# Altium PCB EXPLORER_V3.4.PcbDoc (part 1 of 4)
Units mm, origin at the board's own origin, x right, y up, seen from the top; angles counter-clockwise.
Board outline 160 x 121.01 mm, 2 copper layers (Top Layer, Bottom Layer); 254 components, 245 nets, 1181 pads, 772 vias.
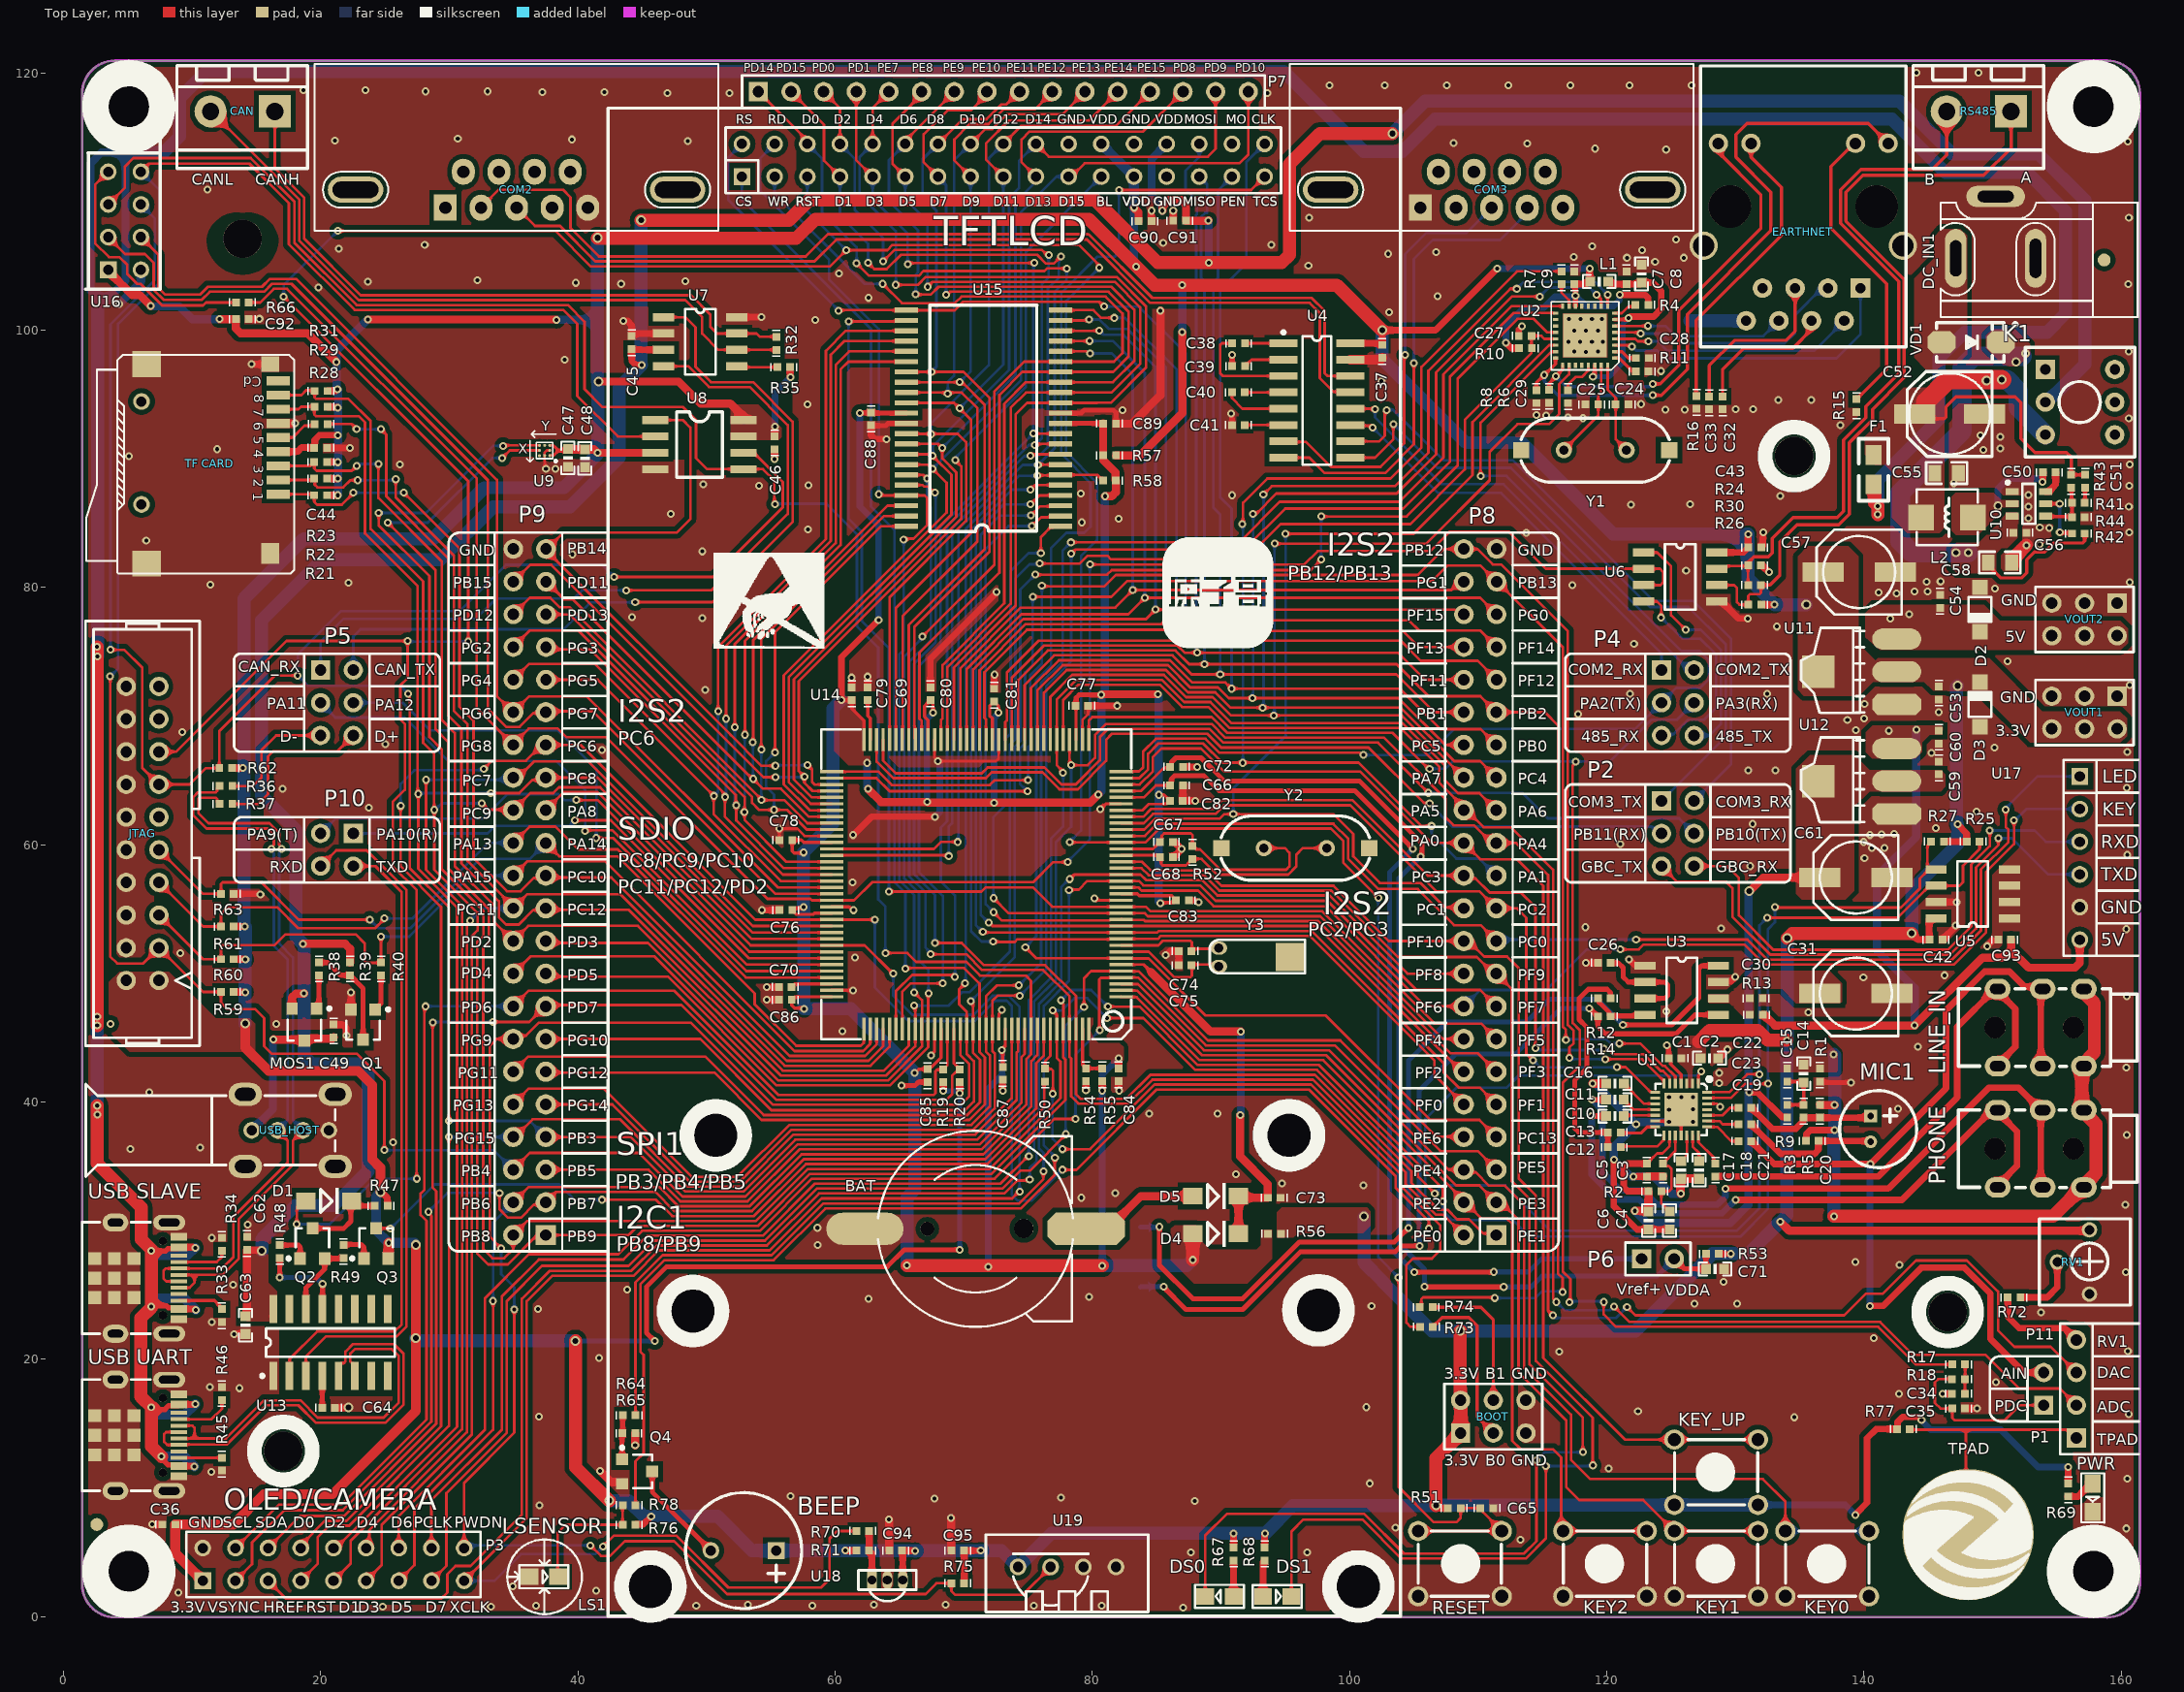
[diagram p0: Top Layer view]
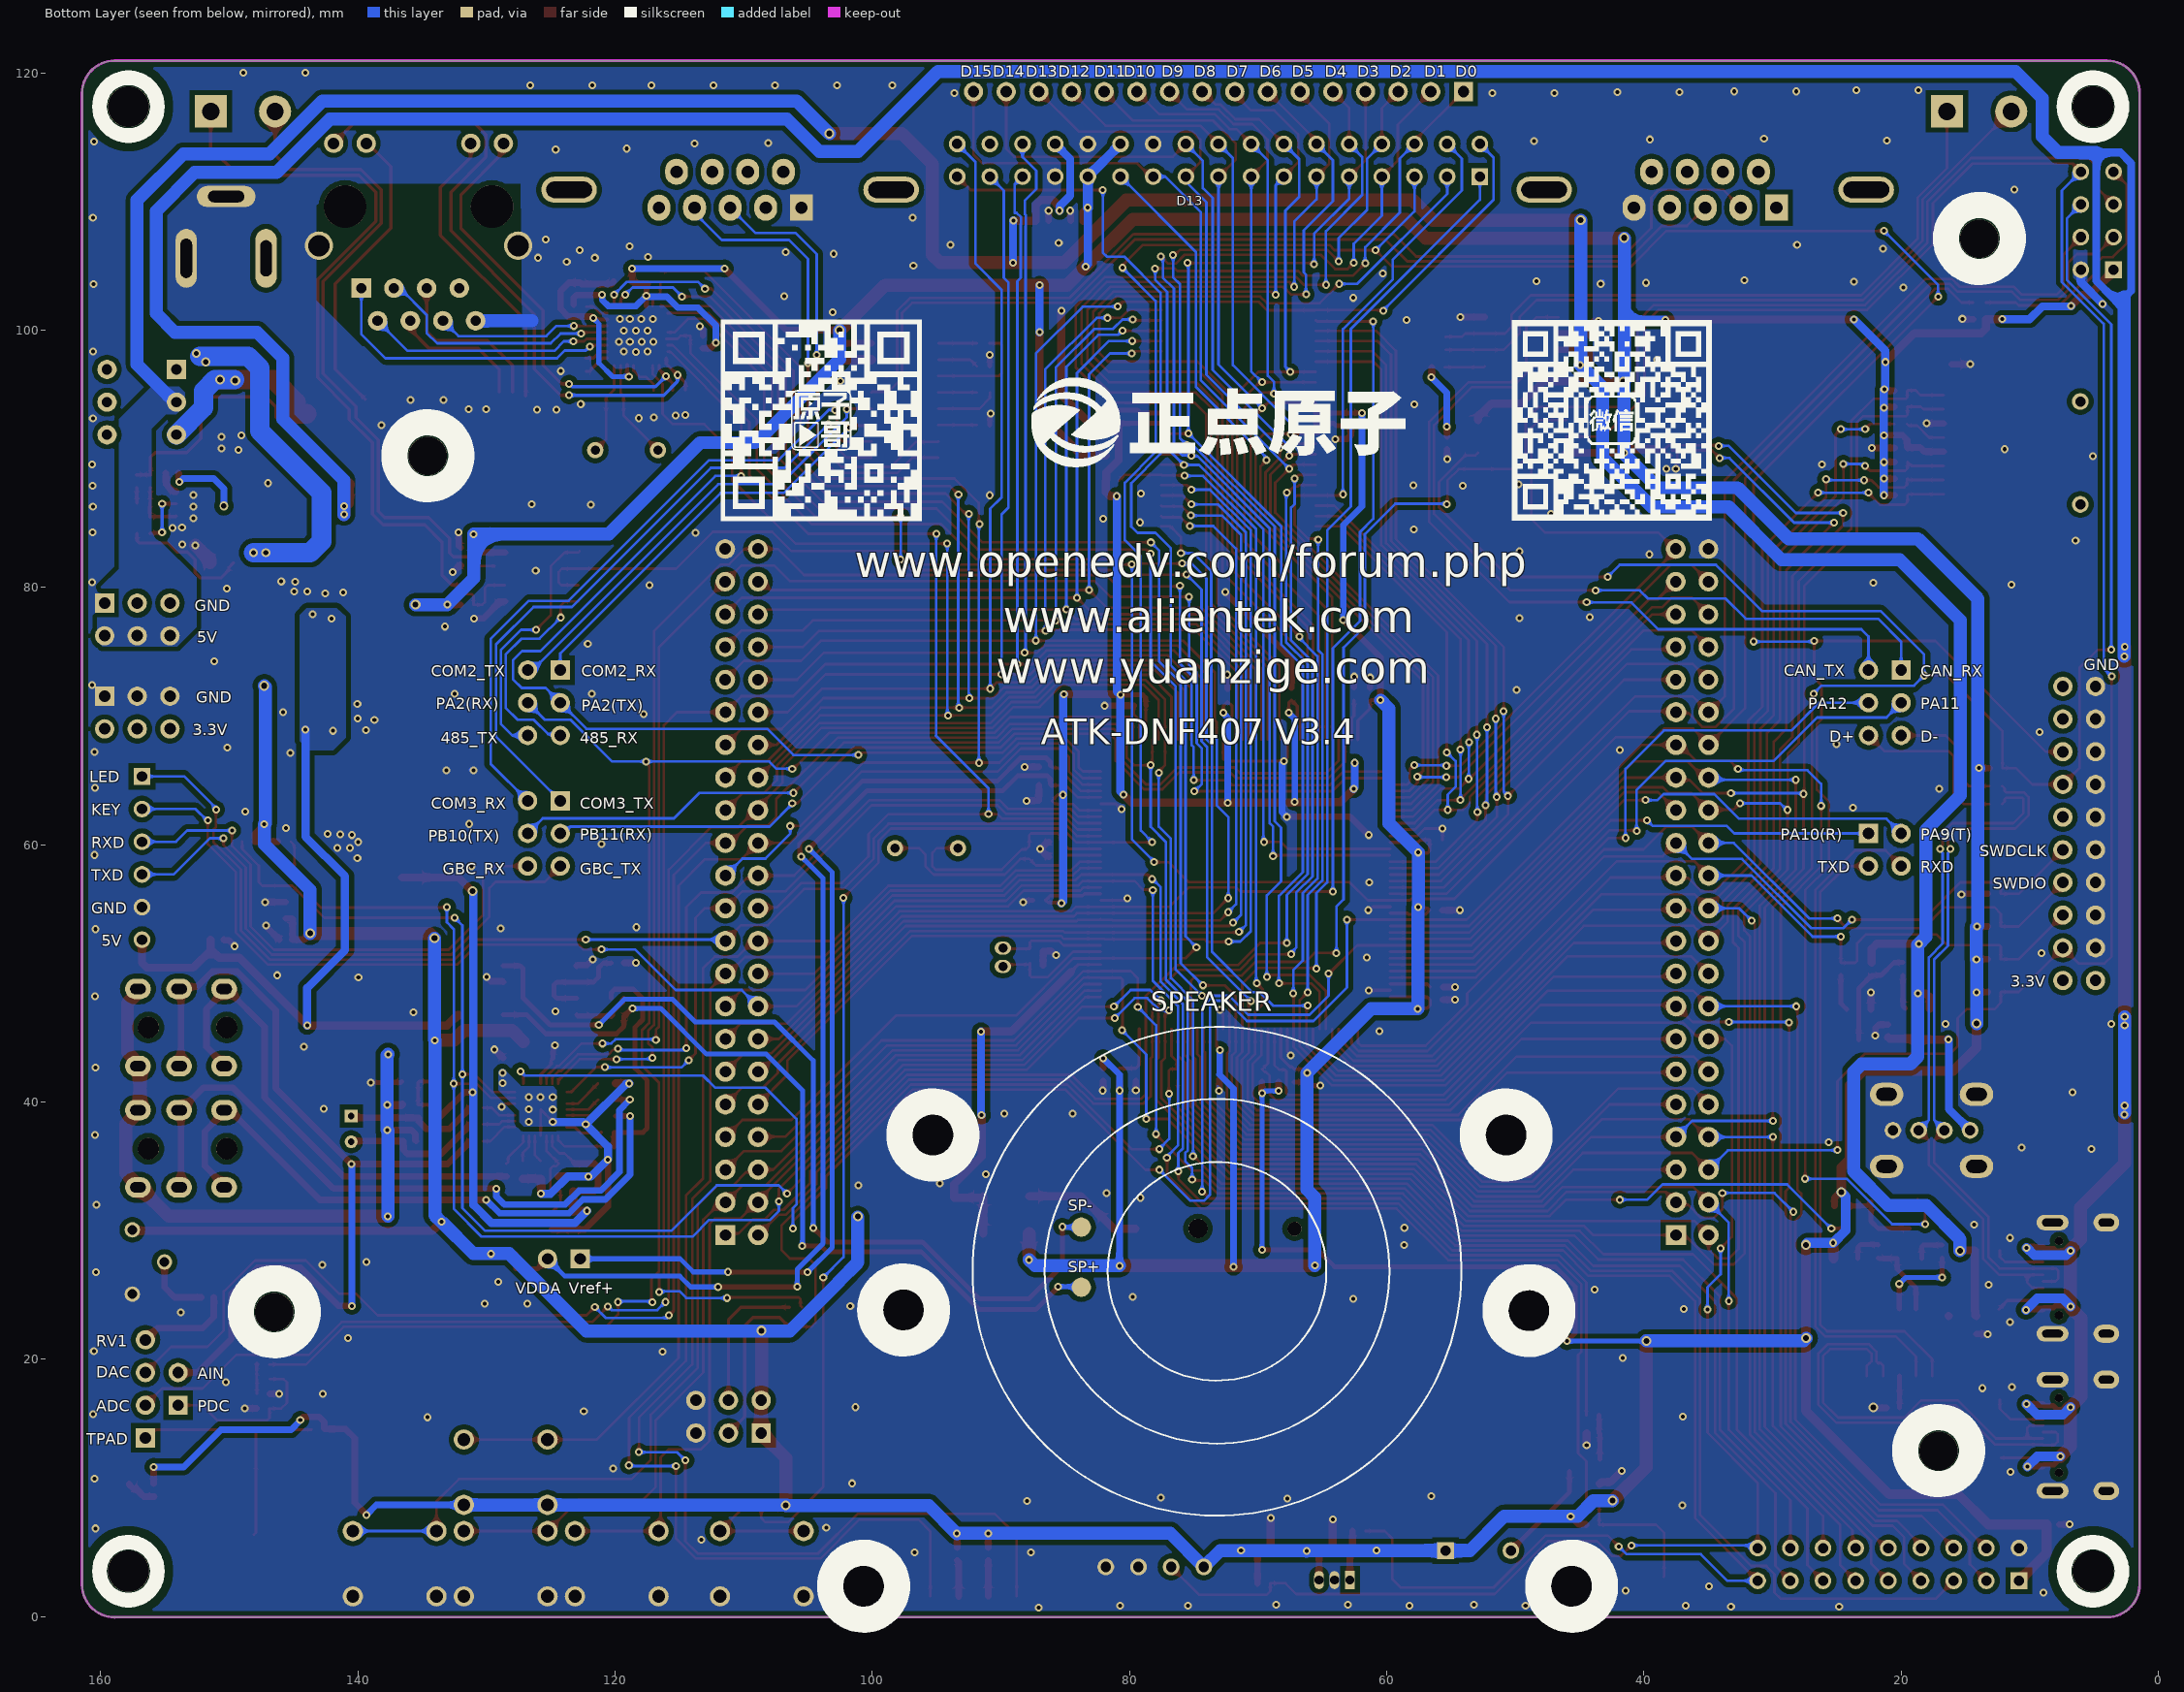
[diagram p1: Bottom Layer view, seen from below]

## Layer stack, top to bottom
Top Solder: solder mask 0.0102, Solder Resist, Dk 3.5
Top Layer: signal copper 0.0356
Dielectric1: dielectric 0.32, FR-4, Dk 4.8
Bottom Layer: signal copper 0.0356
Bottom Solder: solder mask 0.0102, Solder Resist, Dk 3.5

## Board outline
1.448,2.495 ccw(c3.988,2.495) 3.988,-0.045 158.908,-0.045 158.908,-0.051 ccw(c158.908,2.489) 161.448,2.489 161.448,118.415 ccw(c158.908,118.415) 158.908,120.955 3.988,120.955 ccw(c3.988,118.415) 1.448,118.415

## Design rules (kind name [scope] priority, off if disabled: settings)
Clearance [All] p1: gap=0.152 ignorepadtopadclearanceinfootprint=FALSE except(0: Arc-Hole Track-Hole SMDPad-Hole THPad-Hole Via-Hole Fill-Hole Poly-Hole Region-Hole Text-Hole; 0.381: Arc-Fill Arc-Poly Track-Fill Track-Poly SMDPad-Fill SMDPad-Poly THPad-Fill THPad-Poly Via-Fill Via-Poly Fill-Fill Fill-Poly Poly-Poly)
ComponentClearance [All] p1 off: gap=0.254 collisioncheckmode=3 verticalgap=0.254 showdistances=FALSE
DiffPairsRouting [InDifferentialPairClass('diff')] p1: maxlimit=0.203 minlimit=0.203 mostfreqgap=0.203 toplayer_minwidth=0.381 toplayer_maxwidth=0.381 toplayer_prefwidth=0.381 bottomlayer_minwidth=0.381 bottomlayer_maxwidth=0.381 bottomlayer_prefwidth=0.381 maxuncoupledlength=12.7
Height [All] p1 off: minheight=0 maxheight=25.4 prefheight=12.7
HoleSize [All] p1: absolutevalues=TRUE maxlimit=12.7 minlimit=0.025 maxpercent=80.000 minpercent=20.000
MinimumSolderMaskSliver [All] p1 off: minsoldermaskwidth=0.254
NetAntennae [All] p1 off: netantennaetolerance=0
PolygonConnect [All] p1: connectstyle=Direct reliefconductorwidth=0.254 reliefentries=4 polygonreliefangle="90 Angle" airgapwidth=0.254
RoutingVias [All] p1: holewidth=0.457 width=0.762 viastyle="Through Hole" minholewidth=0.254 minwidth=0.508 maxholewidth=0.457 maxwidth=0.762
SilkToSilkClearance [All] p1 off: silktosilkclearance=0.254
SilkToSolderMaskClearance SilkscreenOverComponentPads [IsPad] p1 off: minsilkscreentomaskgap=0.254 clearancetoexposedcopper=TRUE
SolderMaskExpansion [All] p1: expansion=0.102 istentingtop=FALSE
Width [All] p1: maxlimit=2.032 minlimit=0.152 preferedwidth=0.203
22 further rules are at their usual default settings.

## Classes and differential pairs
differential pair class diff: MDI_RX MDI_TX USB
component class DEVICE2: BEEP BOOT C92 C93 C94 C95 DS0 DS1 KEY0 KEY1 KEY2 KEY_UP LS1 P11 PWR Q4 R64 R65 R66 R67 R68 R69 R70 R71 R72 R73 R74 R75 R76 R77 R78 RV1 TPAD U16 U17 U18 U19
component class CORE_DEFG: C88 C89 C90 C91 JTAG P7 P8 P9 P10 R58 R59 R60 R61 R62 R63 TFT_LCD TFTLCD U15
component class CORE_ABC: "2.4'/2.8'/3.5'/4.3' LCD" 2.4'/2.8'LCD BAT C65 C66 C67 C68 C69 C70 C71 C72 C73 C74 C75 C76 C77 C78 C79 C80 C81 C82 C83 C84 C85 C86 C87 D4 D5 P6 R51 R52 R53 R54 R55 R56 R57 RESET U14 Y2 Y3
component class POWER&USB_USART: C50 C51 C52 C53 C54 C55 C56 C57 C58 C59 C60 C61 C62 C63 C64 D1 D2 D3 D6 D7 D8 DC_IN1 F1 K1 L2 Q2 Q3 R41 R42 R43 R44 R45 R46 R47 R48 R49 R50 U10 U11 U12 U13 "USB UART" VD1 VOUT1 VOUT2
component class DEVICE1: C36 C37 C38 C39 C40 C41 C42 C43 C44 C45 C46 C47 C48 C49 CAN COM2 COM3 MOS1 P2 P3 P4 P5 Q1 R19 R20 R21 R22 R23 R24 R25 R26 R27 R28 R29 R30 R31 R32 R33 R34 R35 R36 R37 R38 R39 R40 RS485 "TF CARD" U4 U5 U6 U7 U8 U9 USB1 "USB SLAVE" USB_HOST
component class AUDIO&ETHNET: C1 C2 C3 C4 C5 C6 C7 C8 C9 C10 C11 C12 C13 C14 C15 C16 C17 C18 C19 C20 C21 C22 C23 C24 C25 C26 C27 C28 C29 C30 C31 C32 C33 C34 C35 EARTHNET J1 L1 LINE_IN MIC1 P1 PHONE R1 R2 R3 R4 R5 R6 R7 R8 R9 R10 R11 R12 R13 R14 R15 R16 R17 R18 SP+ SP- U1 U2 U3 Y1

## Components (designator, comment, footprint, x,y, rotation, side; value= is the part's Value field where it differs from the comment)
BAT "BATT" BATM 70.917,30.15 r90 top locked
BEEP "BEEP" BELL-5 55.423,5.131 r180 top
BOOT "Header 3X2" HDR2X3 108.636,14.275 r0 top locked
C1 "104" 0402 124.816,43.409 r0 top
C2 "10uF" 0603P 127.991,43.409 r180 top
C3 "104" 0402 124.384,34.214 r90 top
C4 "10uF" 0603P 124.892,30.785 r90 top
C5 "104" 0402 123.114,34.214 r90 top
C6 "10uF" 0603P 123.241,30.785 r90 top
C7 "104" 0402 121.539,104.581 r270 top
C8 "10uF" 0603P 122.707,104.382 r90 top
C9 "104" 0402 117.475,104.581 r270 top
C10 "10uF" 0603P 120.637,38.911 r180 top
C11 "10uF" 0603P 120.637,40.181 r180 top
C12 "1uF" 0402 121.082,36.5 r180 top
C13 "1uF" 0402 121.082,37.643 r180 top
C14 "10uF" 0603P 135.306,42.215 r90 top
C15 "104" 0402 134.036,42.596 r270 top
C16 "10uF" 0603P 120.637,41.451 r0 top
C17 "10uF" 0603P 125.781,34.722 r90 top
C18 "10uF" 0603P 127.178,34.722 r90 top
C19 "1uF" 0402 131.242,36.957 r180 top
C20 "103" 0402 136.576,38.786 r90 top
C21 "1uF" 0402 128.448,34.214 r90 top
C22 "104" 0402 131.242,39.548 r180 top
C23 "104" 0402 131.242,38.278 r180 top
C24 "22" 0402 121.691,94.234 r180 top
C25 "22" 0402 118.339,94.234 r0 top
C26 "1uF" 0402 119.304,50.825 r0 top
C27 "104" 0402 113.157,99.568 r0 top
C28 "104" 0402 123.266,97.841 r180 top
C29 "104" 0402 116.992,94.336 r90 top
C30 "104" 0402 131.115,48.057 r0 top
C31 "220uF" CC6.56.5 139.37,48.438 r0 top locked
C32 "104" 0402 129.007,93.853 r90 top
C33 "104" 0402 127.965,93.853 r90 top
C34 "102" 0402 146.847,17.323 r0 top
C35 "101" 0402 147.863,16.18 r180 top
C36 "104" 0402 8.687,7.163 r180 top
C37 "104" 0402 102.54,98.857 r270 top
C38 "1uF" 0402 91.872,98.984 r180 top
C39 "1uF" 0402 91.872,97.206 r180 top
C40 "1uF" 0402 90.856,95.174 r0 top
C41 "1uF" 0402 90.856,92.634 r0 top
C42 "104" 0402 146.101,52.629 r180 top
C43 "104" 0402 132.004,83.109 r180 top
C44 "104" 0402 20.498,90.856 r180 top
C45 "104" 0402 44.183,98.539 r90 top
C46 "104" 0402 55.296,91.745 r270 top
C47 "104" 0603P 39.218,90.068 r90 top
C48 "104" 0603P 40.538,90.043 r90 top
C49 "104" 0402 21.006,46.025 r270 top
C50 "104" 0402 154.903,88.96 r180 top
C51 "NC" 0402 157.208,87.76 r90 top
C52 "470uF" "CM D(6.3*5.4)" 146.66,93.497 r180 top
C53 "104" 0402 145.821,71.298 r90 top
C54 "104" 0402 145.923,79.426 r270 top
C55 "22uF" "C 0805" 146.429,88.898 r0 top
C56 "104" 0402 152.624,84.26 r180 top
C57 "220uF" CC6.56.5 139.624,81.204 r0 top locked
C58 "22uF/25V" "C 0805" 150.571,81.939 r180 top
C59 "104" 0402 145.821,66.472 r270 top
C60 "104" 0402 145.821,67.869 r90 top
C61 "220uF" CC6.56.5 139.37,57.455 r0 top locked
C62 "104" 0402 14.275,29.515 r270 top
C63 "10uF" 0603P 14.148,22.657 r90 top
C64 "104" 0402 20.117,16.231 r0 top
C65 "104" 0402 111.176,8.433 r180 top
C66 "225" 0402 87.046,64.618 r180 top
C67 "22" 0402 86.258,60.223 r180 top
C68 "22" 0402 86.258,59.055 r180 top
C69 "225" 0402 62.535,71.247 r90 top
C70 "225" 0402 56.617,48.946 r180 top
C71 "10uF" 0603P 128.422,27.026 r180 top
C72 "104" 0402 87.046,66.065 r180 top
C73 "104" 0402 93.65,32.563 r0 top
C74 "10" 0402 86.716,51.74 r0 top
C75 "10" 0402 86.716,50.622 r0 top
C76 "104" 0402 55.661,54.915 r0 top
C77 "104" 0402 79.68,70.815 r180 top
C78 "104" 0402 55.661,60.376 r0 top
C79 "104" 0402 61.29,72.238 r270 top
C80 "104" 0402 67.412,72.238 r270 top
C81 "104" 0402 72.365,72.136 r270 top
C82 "104" 0402 87.03,63.424 r180 top
C83 "104" 0402 87.503,55.677 r180 top
C84 "104" 0402 82.042,41.621 r90 top
C85 "104" 0402 67.183,41.554 r90 top
C86 "104" 0402 55.626,47.955 r0 top
C87 "104" 0402 73.025,41.732 r90 top
C88 "10uF" 0402 62.789,92.608 r90 top
C89 "10uF" 0402 81.839,92.735 r180 top
C90 "104" 0402 83.591,108.483 r0 top
C91 "104" 0402 86.284,108.509 r0 top
C92 "104" 0402 14.402,100.863 r180 top
C93 "104" 0402 151.435,52.629 r180 top
C94 "104" 0402 65.202,5.131 r180 top
C95 "104" 0402 70.028,5.131 r180 top
CAN "CAN" HEAD2L-0.8 16.434,117.018 r180 top locked
COM2 "USART_F(母头)" DB9 35.23,109.525 r0 top locked
COM3 "USART_M(公头)" DB9 111.049,109.525 r0 top locked
D1 "1N4148" DIODE_SOP 18.847,32.309 r0 top
D2 "SMFJ5.0CA" SOD-123 149.022,78.283 r90 top
D3 "SMFJ3.3CA" SOD-123 149.022,70.917 r270 top
D4 "1N4148" DIODE_SOP 87.808,29.769 r0 top
D5 "1N4148" DIODE_SOP 87.808,32.69 r0 top
DC_IN1 "DC_IN" DC10B 157.785,109.906 r180 top locked
DS0 "LED1" SMDLED 90.983,1.575 r180 top
DS1 "LED1" SMDLED 93.269,1.575 r0 top
EARTHNET "RJ45" HR911105A 135.28,109.626 r0 top
F1 "1000mA" 0805 140.741,88.011 r90 top
JTAG "JTAG" JTAG_20 6.147,60.884 r90 top locked
K1 "BUTTON" BTN8.5*8.5 154.102,96.952 r0 top locked
KEY0 "KEY_M" KEY_M 140.386,1.575 r180 top locked
KEY1 "KEY_M" KEY_M 131.75,1.575 r180 top locked
KEY2 "KEY_M" KEY_M 123.114,1.575 r180 top locked
KEY_UP "KEY_M" KEY_M 131.75,8.687 r180 top locked
L1 "220R,2.0A,0.05DCR" 0603P 119.405,103.784 r0 top
L2 "4.7uH" L-SMD-0420 146.454,85.455 r180 top
LINE_IN "LINE_IN" PHONE_ST 153.746,45.796 r0 top
LS1 "LSENS" SMDLED 36.246,3.099 r0 top locked
MIC1 "MIC" MIC-6022 140.513,38.913 r270 top locked
MOS1 "SI2301" SO-G3/C2.5 18.72,46.025 r180 top
P1 "Header 2" HDR1X2 153.975,16.434 r90 top locked
P2 "RS232/BTCOM&GPS" HDR2X3 124.257,63.424 r270 top
P3 "OV2640" HDR2X9 10.829,2.788 r0 top locked
P4 "RS232/RS485" HDR2X3 124.257,73.584 r270 top locked
P5 "USB/CAN" HDR2X3 19.99,73.584 r270 top locked
P6 "VREF_SEL" HDR1X2 122.707,27.813 r0 top
P7 "HEAD1*16" HDR1X16 54.026,118.542 r0 top locked
P8 "HEAD2*22" HEAD2*22 111.43,29.653 r90 top locked
P9 "HEAD2*22" HEAD2*22 37.516,29.653 r90 top locked
P10 "USART1" HDR2X2 22.53,60.884 r180 top
P11 "Header 4" HDR1X4 156.515,13.894 r90 top locked
PHONE "PHONE" PHONE_ST 153.746,36.373 r0 top
PWR "SYS" SMDLED 157.785,10.338 r270 top
Q1 "S8050" SOT-23R 23.292,46.152 r180 top
Q2 "S8050" SOT-23R 19.355,28.88 r0 top
Q3 "S8550" SOT-23R 24.308,28.88 r0 top
Q4 "S8050" SOT-23R 44.475,11.278 r270 top
R1 "0R" 0402 136.576,42.596 r270 top
R2 "10R" 0402 123.241,33.071 r0 top
R3 "2K" 0402 134.036,38.786 r90 top
R4 "4.7K" 0402 122.225,101.981 r0 top
R5 "2K" 0402 135.306,38.786 r90 top
R6 "4.7K" 0402 115.519,94.361 r90 top
R7 "22R" 0402 116.484,103.581 r90 top
R8 "4.7K" 0402 114.529,94.336 r90 top
R9 "680R" 0402 136.474,36.982 r180 top
R10 "4.7K" 0402 114.173,98.603 r180 top
R11 "2.49K" 0402 122.25,96.799 r0 top
R12 "5.6K" 0402 119.304,48.057 r0 top
R13 "10R" 0402 132.131,46.787 r180 top
R14 "20K" 0402 119.304,46.66 r0 top
R15 "510R" 0402 139.421,94.64 r270 top
R16 "510R" 0402 126.975,94.894 r270 top
R17 "4.7K" 0402 147.863,19.609 r180 top
R18 "47K" 0402 146.847,18.466 r0 top
R19 "4.7K" 0402 68.402,42.545 r270 top
R20 "4.7K" 0402 69.698,42.545 r270 top
R21 "47K" 0402 20.498,87.173 r180 top
R22 "47K" 0402 20.498,88.464 r180 top
R23 "47K" 0402 20.498,89.755 r180 top
R24 "360R" 0402 130.988,81.712 r0 top
R25 "4.7K" 0402 148.996,60.249 r180 top
R26 "360R" 0402 132.004,78.664 r180 top
R27 "4.7K" 0402 145.212,60.249 r0 top
R28 "100R" 0402 19.533,92.71 r0 top
R29 "47K" 0402 20.523,94.056 r180 top
R30 "120R" 0402 130.988,80.188 r0 top
R31 "47K" 0402 20.523,95.275 r180 top
R32 "120R" 0402 55.423,98.476 r90 top
R33 "4.7K" 0402 12.319,23.901 r270 top
R34 "4.7K" 0402 12.319,28.448 r90 top
R35 "510R" 0402 55.499,97.13 r0 top
R36 "10R" 0402 13.132,64.567 r180 top
R37 "10R" 0402 13.132,63.17 r180 top
R38 "10K" 0402 19.863,50.851 r270 top
R39 "100K" 0402 22.276,50.851 r270 top
R40 "4.7K" 0402 24.689,49.851 r90 top
R41 "0R" 0402 156.171,86.583 r0 top
R42 "100K" 0402 156.171,84.196 r0 top
R43 "52.3K 1%" 0402 156.113,87.76 r90 top
R44 "10K 1%" 0402 156.171,85.471 r0 top
R45 "4.7K" 0402 12.319,12.347 r270 top
R46 "4.7K" 0402 12.319,16.84 r90 top
R47 "10K" 0402 25.197,31.928 r180 top
R48 "1K" 0402 16.815,28.88 r270 top
R49 "1K" 0402 21.768,28.88 r270 top
R50 "1K" 0402 76.327,42.596 r270 top
R51 "10K" 0402 108.636,8.433 r180 top
R52 "1M" 0402 87.782,58.903 r90 top
R53 "10R" 0402 127.711,28.194 r0 top
R54 "0R" 0402 79.502,42.621 r270 top
R55 "0R" 0402 80.772,42.621 r270 top
R56 "0R" 0402 94.666,29.769 r180 top
R57 "0R" 0402 81.839,90.272 r180 top
R58 "10K" 0402 80.823,88.316 r0 top
R59 "10K" 0402 12.243,48.565 r0 top
R60 "10K" 0402 12.243,51.105 r0 top
R61 "10K" 0402 12.243,53.645 r0 top
R62 "10K" 0402 12.116,65.964 r0 top
R63 "10K" 0402 12.243,56.185 r0 top
R64 "1K" 0402 44.475,15.646 r180 top
R65 "10K" 0402 43.459,14.249 r0 top
R66 "1K" 0402 14.402,102.159 r180 top
R67 "510R" 0402 90.983,4.369 r90 top
R68 "510R" 0402 93.396,4.369 r90 top
R69 "510R" 0402 155.88,9.347 r90 top
R70 "1K" 0402 61.646,6.655 r0 top
R71 "4.7K" 0402 61.646,5.131 r0 top
R72 "1K" 0402 151.165,24.816 r0 top
R73 "10K" 0402 106.477,22.53 r180 top
R74 "10K" 0402 105.461,24.054 r0 top
R75 "4.7K" 0402 69.037,2.591 r0 top
R76 "47K" 0402 43.485,7.137 r0 top
R77 "1M" 0402 143.561,14.58 r180 top
R78 "1K" 0402 44.475,8.661 r180 top
RESET "KEY_M" KEY_M 105.334,6.655 r0 top locked
RS485 "RS485" HEAD2L-0.8 151.435,117.018 r180 top locked
RV1 "50K" RV 157.531,25.07 r0 top locked
SP+ "SPK+" TP-1.5 83.744,25.603 r90 top
SP- "SPK-" TP-1.5 83.744,30.277 r90 top
"TF CARD" "SD-MICRO-TF" SD-MICRO-TF 16.688,87.258 r270 top locked
TFTLCD "TFT_LCD" db2*17-4.3 52.756,111.938 r0 top locked
TPAD "ALIENTEK" ATK_TPAD 147.955,11.582 r0 top
U1 "ES8388" qfn28 125.781,39.421 r270 top locked
U2 "YT8512C" YT8512C 120.066,97.282 r180 top
U3 "MD8002A" SOP-8 122.987,50.597 r0 top locked
U4 "TPT3232" SOP16M 97.46,94.539 r270 top locked
U5 "24C02" SOP-8 151.308,54.28 r180 top locked
U6 "TPT8485" SOP-8 122.86,82.728 r0 top locked
U7 "SIT1050T" SOP-8 46.66,101.016 r0 top
U8 "25Q128" SOIC-8 46.025,93.015 r0 top locked
U9 "ST480MC" ST480MC 37.414,90.653 r0 top
U10 "SCT2230CTVB" SOT23-6N 152.83,86.511 r180 top
U11 "AMS1117-3.3" AMS1117 142.545,70.917 r90 top locked
U12 "AMS1117-3.3" AMS1117 142.545,62.408 r90 top
U13 "CH340C" SOP16M 20.752,21.311 r0 top locked
U14 "STM32F407ZGT6" LQFP144 82.22,48.184 r180 top locked
U15 "XM8A51216V33A" TSOP44 77.521,84.76 r180 top locked
U16 "WIRELESS" NRF24L01 6.02,104.699 r0 top locked
U17 "ATK MODULE" HEAD6 156.769,65.329 r270 top locked
U18 "LF0038GKLL-1" IR-LF0038GKLL-1 62.789,2.845 r0 top
U19 "DHT11&DS18B20" DHT11 74.219,3.861 r0 top
"USB SLAVE" "USB-B(Mini)" "USB Type-C" 6.502,26.314 r270 top
"USB UART" "USB" "USB Type-C" 6.502,14.097 r270 top
USB_HOST "USB-A-90" USB-A-90 21.133,35.103 r0 top locked
VD1 "SS34" SMA 148.332,99.06 r0 top
VOUT1 "VCC3.3" HDR2X3 159.69,71.552 r180 top locked
VOUT2 "VCC5" HDR2X3 159.69,78.791 r180 top locked
Y1 "25MHz" XTAL_US 121.539,90.678 r180 top
Y2 "8MHz" XTAL_US 98.222,59.741 r180 top locked
Y3 "32.768K" XTAL32 89.84,51.968 r0 top locked

## Footprints (in the part's own frame and the unit in brackets; to place one, negate y for a bottom-side part, rotate by r counter-clockwise, add the part's x,y. Pads: shape width x height; smd on the part's side, far side on the other; paste and mask are expansions set on the pad)
0402 [mm]
  rect 0.6x0.6 smd: 1(0,0) 2(1,0)
  silkscreen extent -0.5,-0.3 1.5,0.3
0603P [mil]
  rect 30x30 smd: 1(-27,0) 2(27.5,-0.06)
  silkscreen extent -50,-20 50,20
0805 [mil]
  rect 60x50 smd: 1(0,-0.06) 2(90,-0.06)
  silkscreen extent -50,-45 140,45
AMS1117 [mil]
  oct 65x150 smd: 1(0.03,-0.06)
  oval 65x150 smd: 2(100.03,-0.06) 3(200.03,-0.06)
  rect 100x100 smd: 4(100.03,239.94)
  silkscreen extent -26,100 234,293
ATK_TPAD [mil]
  round 402 smd paste-450 mask+4: 1(5,-205)
  silkscreen extent -190,-402 202,-9
BATM [mm]
  round 1.1 hole 1.1 unplated: 0(0,3.748)
  round 1.5 hole 1.5 unplated: 0(0.025,-3.752)
  oct 2.5x6 smd: 1(0,-8.602)
  oval 2.5x6 smd: 2(0,8.598)
  silkscreen extent -7.62,-7.58 7.62,7.57
BELL-5 [mm] "PIN:5MM,SIZE:10MM"
  rect 1.3x1.3 hole 0.8: 1(0,0)
  round 1.3 hole 0.8: 2(5.08,0)
  silkscreen extent -1.97,-4.51 7.05,4.51
BTN8.5*8.5 [mm]
  rect 1.5x1.5 hole 0.8: 1(0,0)
  round 1.5 hole 0.8: 2(0,-2.54) 3(0,-5.08) 4(5.4,-5.08) 5(5.4,-2.54) 6(5.4,0)
  silkscreen extent -1.55,-6.79 6.95,1.71
"C 0805" [mm] "无极性贴片电容(0805)"
  rect 1x1.27 smd: 1(-0.914,0) 2(0.914,0)
  silkscreen extent -1.6,-0.84 1.6,0.84, body extent -1,-0.61 1,0.61, height 0.51
CC6.56.5 [mm]
  rect 3.2x1.5 smd: 1(-2.794,0) 2(2.8,0)
  silkscreen extent -3.3,-3.3 3.3,3.3
"CM D(6.3*5.4)" [mm] "贴片电解电容，直径6.3mm，高5.4mm"
  rect 3.2x1.5 smd: 1(2.7,0) 2(-2.7,0)
  silkscreen extent -3.3,-3.3 3.3,3.3, body extent -3.5,-3.3 3.5,3.3, height 5.4
db2*17-4.3 [mm] "DB_LCD-4.3'"
  rect 1.3x1.3 hole 0.8: 1(-0.002,0.006)
  round 1.3 hole 0.8: 2(-0.002,2.546) 3(2.538,0.006) 4(2.538,2.546) 5(5.08,0) 6(5.078,2.546) 7(7.62,0) 8(7.62,2.54) 9(10.158,0.006) 10(10.158,2.546) 11(12.698,0.006) 12(12.698,2.546) 13(15.238,0.006) 14(15.238,2.546) 15(17.778,0.006) 16(17.778,2.546) 17(20.318,0.006) 18(20.318,2.546) 19(22.858,0.006) 20(22.858,2.546) 21(25.398,0.006) 22(25.398,2.546) 23(27.938,0.006) 24(27.938,2.546) 25(30.478,0.006) 26(30.478,2.546) 27(33.018,0.006) 28(33.018,2.546) 29(35.558,0.006) 30(35.558,2.546) 31(38.098,0.006) 32(38.098,2.546) 33(40.638,0.006) 34(40.638,2.546)
  round 3.4 hole 3.4: ""(-7.125,-109.596) ""(-3.81,-88.18) ""(-2.037,-74.525) ""(42.54,-74.525) ""(44.82,-88.12) ""(47.925,-109.596)
  silkscreen extent -10.4,-111.89 51.19,5.33
DB9 [mil]
  oval 170x80 hole 50 slot 140 at 0 deg: 0(-493,55) 0(493,55)
  rect 70x80 hole 38: 1(-218,0)
  oval 70x80 hole 38: 2(-109,0) 3(0,0) 4(109,0) 5(218,0) 6(-163,110) 7(-54,110) 8(55,110) 9(164,110)
  silkscreen extent -618,-70 618,440
DC10B [mil]
  oval 65x180 hole 35 slot 110 at 90 deg: 1(419.09,170)
  oval 65x180 hole 35 slot 120 at 90 deg: 2(175,170)
  oval 180x65 hole 35 slot 110 at 0 deg: 3(297.05,-19.35)
  silkscreen extent -138,0 465,350
DHT11 [mm] "2.54mm"
  round 1.3 hole 0.8: 1(0,0) 2(2.54,0) 3(5.08,0) 4(7.62,0)
  silkscreen extent -2.5,-3.5 10.12,2.5
DIODE_SOP [mm]
  rect 1.5x1.3 smd: 1(0,0) 2(3.556,0)
  silkscreen extent 1.14,-1.02 2.56,1.02
HDR1X2 [mm] "Connector; Header; 2 Position"
  rect 1.5x1.5 hole 0.9: 1(0,0)
  round 1.5 hole 0.9: 2(2.54,0)
  silkscreen extent -1.27,-1.27 3.81,1.27
HDR1X4 [mm] "Connector; Header; 4 Position"
  rect 1.5x1.5 hole 0.9: 1(0,0)
  round 1.5 hole 0.9: 2(2.54,0) 3(5.08,0) 4(7.62,0)
  silkscreen extent -1.27,-1.27 8.89,1.27
HDR1X16 [mm] "Connector; Header; 16 Position"
  rect 1.5x1.5 hole 0.9: 1(0,0)
  round 1.5 hole 0.9: 2(2.54,0) 3(5.08,0) 4(7.62,0) 5(10.16,0) 6(12.7,0) 7(15.24,0) 8(17.78,0) 9(20.32,0) 10(22.86,0) 11(25.4,0) 12(27.94,0) 13(30.48,0) 14(33.02,0) 15(35.56,0) 16(38.1,0)
  silkscreen extent -1.27,-1.27 39.37,1.27
HDR2X2 [mm] "Connector; Header; 2x2 Position"
  rect 1.5x1.5 hole 0.9: 1(0,0)
  round 1.5 hole 0.9: 2(0,2.54) 3(2.54,0) 4(2.54,2.54)
  silkscreen extent -1.27,-1.27 3.81,3.81
HDR2X3 [mm] "Connector; Header; 3x2 Position"
  rect 1.5x1.5 hole 0.9: 1(0,0)
  round 1.5 hole 0.9: 2(0,2.54) 3(2.54,0) 4(2.54,2.54) 5(5.08,0) 6(5.08,2.54)
  silkscreen extent -1.27,-1.27 6.35,3.81
HDR2X9 [mm] "Connector; Header; 9x2 Position"
  rect 1.3x1.3 hole 0.8: 1(0,0)
  round 1.3 hole 0.8: 2(0,2.54) 3(2.54,0) 4(2.54,2.54) 5(5.08,0) 6(5.08,2.54) 7(7.62,0) 8(7.62,2.54) 9(10.16,0) 10(10.16,2.54) 11(12.7,0) 12(12.7,2.54) 13(15.24,0) 14(15.24,2.54) 15(17.78,0) 16(17.78,2.54) 17(20.32,0) 18(20.32,2.54)
  silkscreen extent -1.27,-1.27 21.59,3.81
HEAD2*22 [mil] "PIN:2.54mm;HEAD;"
  rect 62x62 hole 35.43: 1(0.43,0.42)
  round 62 hole 35.43: 2(0.43,100.42) 3(100.43,0.42) 4(100.43,100.42) 5(200.43,0.42) 6(200.43,100.42) 7(300.43,0.42) 8(300.43,100.42) 9(400.43,0.42) 10(400.43,100.42) 11(500.43,0.42) 12(500.43,100.42) 13(600.43,0.42) 14(600.43,100.42) 15(700.43,0.42) 16(700.43,100.42) 17(800.43,0.42) 18(800.43,100.42) 19(900.43,0.42) 20(900.43,100.42) 21(1000.43,0.42) 22(1000.43,100.42) 23(1100.43,0.42) 24(1100.43,100.42) 25(1200.43,0.42) 26(1200.43,100.42) 27(1300.43,0.42) 28(1300.43,100.42) 29(1400.43,0.42) 30(1400.43,100.42) 31(1500.43,0.42) 32(1500.43,100.42) 33(1600.43,0.42) 34(1600.43,100.42)
  round 60 hole 35.43: 35(1700,0) 36(1700,100) 37(1800,0) 38(1800,100) 39(1900,0) 40(1900,100) 41(2000,0) 42(2000,100) 43(2100,0) 44(2100,100)
  silkscreen extent -50,-50 2150,157
HEAD2L-0.8 [mm] "10.16mm*10.16mm,pin:5.08mm"
  rect 2.5x2.5 hole 1.35: 1(0,0)
  round 2.5 hole 1.35: 2(5,0)
  silkscreen extent -2.54,-3.56 7.62,4.45
HEAD6 [mm] "PIN:2.54mm;HEAD;"
  rect 1.3x1.3 hole 0.8: 1(0.011,0.011)
  round 1.3 hole 0.8: 2(2.551,0.011) 3(5.091,0.011) 4(7.631,0.011) 5(10.171,0.011) 6(12.711,0.011)
  silkscreen extent -1.26,-1.26 13.97,1.3
HR911105A [mm] "NET_WORK"
  rect 1.524x1.524 hole 0.8: 1(4.45,-6.35)
  round 1.524 hole 0.8: 2(3.18,-8.89) 3(1.91,-6.35) 4(0.64,-8.89) 5(-0.63,-6.35) 6(-1.9,-8.89) 7(-3.17,-6.35) 8(-4.44,-8.89)
  round 1.5 hole 0.9: 9(6.6,4.9) 10(4.064,4.9) 11(-4.064,4.9) 12(-6.6,4.9)
  round 2.2 hole 1.65: 13(7.75,-3.048) 14(-7.75,-3.048)
  round 3.3 hole 3.3 unplated: ""(-5.714,0) ""(5.716,0)
  silkscreen extent -8,-10.92 8,10.92
IR-LF0038GKLL-1 [mm] "红外接收管"
  rect 0.75x1.4 hole 0.7: 1(0.07,0)
  oval 0.75x1.4 hole 0.7: 2(1.27,0) 3(2.47,0)
  silkscreen extent -0.98,-1.65 3.52,0.75
JTAG_20 [mm]
  round 1.5 hole 0.9: 1(-11.43,-1.27) 2(-11.43,1.27) 3(-8.89,-1.27) 4(-8.89,1.27) 5(-6.35,-1.27) 6(-6.35,1.27) 7(-3.81,-1.27) 8(-3.81,1.27) 9(-1.27,-1.27) 10(-1.27,1.27) 11(1.27,-1.27) 12(1.27,1.27) 13(3.81,-1.27) 14(3.81,1.27) 15(6.35,-1.27) 16(6.35,1.27) 17(8.89,-1.27) 18(8.89,1.27) 19(11.43,-1.27) 20(11.43,1.27)
  silkscreen extent -16.51,-4.45 16.51,4.45
KEY_M [mil]
  round 62 hole 39.37: 1(0,0) 1(255.91,0) 2(0,-200) 2(255.91,-200)
  silkscreen extent 0,-200 255,0
L-SMD-0420 [mm] "一体化成型电感 4*4.5*2mm（长宽高）"
  rect 2x2 smd: 1(-2,0) 2(2,0)
  silkscreen extent -2.39,-2.16 2.36,2.17, body extent -2.26,-2.06 2.24,2.04, height 1.91
LQFP144 [mm]
  rect 1.8x0.254 smd: 1(-0.009,0.001) 2(-0.009,-0.499) 3(-0.009,-0.999) 4(-0.009,-1.499) 5(-0.009,-1.999) 6(-0.009,-2.499) 7(-0.009,-2.999) 8(-0.009,-3.499) 9(-0.009,-3.999) 10(-0.009,-4.499) 11(-0.009,-4.999) 12(-0.009,-5.499) 13(-0.009,-5.999) 14(-0.009,-6.499) 15(-0.009,-6.999) 16(-0.009,-7.499) 17(-0.009,-7.999) 18(-0.009,-8.499) 19(-0.009,-8.999) 20(-0.009,-9.499) 21(-0.009,-9.999) 22(-0.009,-10.499) 23(-0.009,-10.999) 24(-0.009,-11.499) 25(-0.009,-11.999) 26(-0.009,-12.499) 27(-0.009,-12.999) 28(-0.009,-13.499) 29(-0.009,-13.999) 30(-0.009,-14.499) 31(-0.009,-14.999) 32(-0.009,-15.499) 33(-0.009,-15.999) 34(-0.009,-16.499) 35(-0.009,-16.999) 36(-0.009,-17.499) 73(22.491,-17.499) 74(22.491,-16.999) 75(22.491,-16.499) 76(22.491,-15.999) 77(22.491,-15.499) 78(22.491,-14.999) 79(22.491,-14.499) 80(22.491,-13.999) 81(22.491,-13.499) 82(22.491,-12.999) 83(22.491,-12.499) 84(22.491,-11.999) 85(22.491,-11.499) 86(22.491,-10.999) 87(22.491,-10.499) 88(22.491,-9.999) 89(22.491,-9.499) 90(22.491,-8.999) 91(22.491,-8.499) 92(22.491,-7.999) 93(22.491,-7.499) 94(22.491,-6.999) 95(22.491,-6.499) 96(22.491,-5.999) 97(22.491,-5.499) 98(22.491,-4.999) 99(22.491,-4.499) 100(22.491,-3.999) 101(22.491,-3.499) 102(22.491,-2.999) 103(22.491,-2.499) 104(22.491,-1.999) 105(22.491,-1.499) 106(22.491,-0.999) 107(22.491,-0.499) 108(22.491,0.001)
  rect 0.254x1.8 smd: 37(2.491,-19.999) 38(2.991,-19.999) 39(3.491,-19.999) 40(3.991,-19.999) 41(4.491,-19.999) 42(4.991,-19.999) 43(5.491,-19.999) 44(5.991,-19.999) 45(6.491,-19.999) 46(6.991,-19.999) 47(7.491,-19.999) 48(7.991,-19.999) 49(8.491,-19.999) 50(8.991,-19.999) 51(9.491,-19.999) 52(9.991,-19.999) 53(10.491,-19.999) 54(10.991,-19.999) 55(11.491,-19.999) 56(11.991,-19.999) 57(12.491,-19.999) 58(12.991,-19.999) 59(13.491,-19.999) 60(13.991,-19.999) 61(14.491,-19.999) 62(14.991,-19.999) 63(15.491,-19.999) 64(15.991,-19.999) 65(16.491,-19.999) 66(16.991,-19.999) 67(17.491,-19.999) 68(17.991,-19.999) 69(18.491,-19.999) 70(18.991,-19.999) 71(19.491,-19.999) 72(19.991,-19.999) 109(19.991,2.501) 110(19.491,2.501) 111(18.991,2.501) 112(18.491,2.501) 113(17.991,2.501) 114(17.491,2.501) 115(16.991,2.501) 116(16.491,2.501) 117(15.991,2.501) 118(15.491,2.501) 119(14.991,2.501) 120(14.491,2.501) 121(13.991,2.501) 122(13.491,2.501) 123(12.991,2.501) 124(12.491,2.501) 125(11.991,2.501) 126(11.491,2.501) 127(10.991,2.501) 128(10.491,2.501) 129(9.991,2.501) 130(9.491,2.501) 131(8.991,2.501) 132(8.491,2.501) 133(7.991,2.501) 134(7.491,2.501) 135(6.991,2.501) 136(6.491,2.501) 137(5.991,2.501) 138(5.491,2.501) 139(4.991,2.501) 140(4.491,2.501) 141(3.991,2.501) 142(3.491,2.501) 143(2.991,2.501) 144(2.491,2.501)
  silkscreen extent -0.81,-20.8 23.29,3.3
MIC-6022 [mm] "6mm*2.2mm"
  rect 1x1 hole 0.5: 1(0,0)
  round 1 hole 0.5: 2(2,0)
  silkscreen extent -1.99,-2.41 4.01,3.58
NRF24L01 [mm]
  round 1.3 hole 0.8: 1(0,0) 3(0,2.54) 4(-2.54,2.54) 5(0,5.08) 6(-2.54,5.08) 7(0,7.62) 8(-2.54,7.62)
  rect 1.3x1.3 hole 0.8: 2(-2.54,0)
  silkscreen extent -4.32,-1.5 1.5,10.16
PHONE_ST [mm] "PHONE_ST"
  round 1.676 hole 1.676: 0(-3.556,0) 0(2.54,0)
  oval 2x1.6 hole 0.8 slot 1.2 at 0 deg: 1(-3.35,-3) 1(-3.35,3) 2(0.15,-3) 2(0.15,3) 3(3.35,-3) 3(3.35,3)
  silkscreen extent -6.39,-3.01 7.49,3
qfn28 [mm] "QFN, 28-Leads, Body 4.0x4.0mm (max), Pitch 0.45mm, ES8388"
  rect 0.75x0.23 smd: 1(-2.025,1.35) 2(-2.025,0.9) 3(-2.025,0.45) 4(-2.025,0) 5(-2.025,-0.45) 6(-2.025,-0.9) 7(-2.025,-1.35) 15(2.025,-1.35) 16(2.025,-0.9) 17(2.025,-0.45) 18(2.025,0) 19(2.025,0.45) 20(2.025,0.9) 21(2.025,1.35)
  rect 0.23x0.75 smd: 8(-1.35,-2.025) 9(-0.9,-2.025) 10(-0.45,-2.025) 11(0,-2.025) 12(0.45,-2.025) 13(0.9,-2.025) 14(1.35,-2.025) 22(1.35,2.025) 23(0.9,2.025) 24(0.45,2.025) 25(0,2.025) 26(-0.45,2.025) 27(-0.9,2.025) 28(-1.35,2.025)
  rect 2.6x2.6 smd: 29(0,0)
  silkscreen extent -2.52,-2 2,2.36
RV [mm]
  round 1.2 hole 0.75: 1(0,0) 2(-2.5,2.5) 3(0,5)
  silkscreen extent -3.9,-0.85 3.2,5.85
SD-MICRO-TF [mm]
  round 1.3 hole 0.8 unplated: 0(-7.2,-10.627) 0(0.8,-10.627)
  rect 0.7x1.8 smd: 1(0,0) 2(-1.1,0) 3(-2.2,0) 4(-3.3,0) 5(-4.4,0) 6(-5.5,0) 7(-6.6,0) 8(-7.7,0) 9(-8.8,0)
  rect 1.6x1.4 smd: 10(4.6,-0.627)
  rect 2.032x2.2 smd: 11(5.4,-10.227) 12(-10.1,-10.227)
  rect 1.2x1.4 smd: 13(-10.1,-0.627)
  silkscreen extent -10.82,-14.91 6.17,1.25, body extent -10.37,-14.85 5.9,0.34, height 1.8
SMA [mm] "4.5x2.6*2.2mm（长宽高，不包括引脚）"
  oct 2.2x1.75 smd: 1(-2.3,0) 2(2.3,0)
  silkscreen extent -2.7,-1.52 3.56,1.52, body extent -2.53,-1.3 2.57,1.3, height 2.15
SMDLED [mm]
  rect 1.4x1.27 smd: 1(0.001,-0.002) 2(2.211,-0.002)
  silkscreen extent -0.8,-0.89 3.01,0.89
SO-G3/C2.5 [mm] "SOT-23; 3 Leads; Body 3.0 x 2.6 mm, inc. leads (LxW max)"
  rect 0.9x0.95 smd: 1(-0.95,-1.25) 2(0.95,-1.25) 3(0,1.25)
  silkscreen extent -2.08,-1.37 1.3,1.25
SOD-123 [mm]
  rect 1.2x1.2 smd: 1(1.73,0) 2(-1.73,0)
  silkscreen extent -0.97,-0.89 0.97,0.89
SOIC-8 [mil]
  rect 80x24 smd: 1(0,0) 2(0,-50.06) 3(0,-100.06) 4(0,-150.06) 5(270,-150) 6(270,-100) 7(270,-50) 8(270,0)
  silkscreen extent 65,-175 205,25
SOP16M [mm]
  rect 0.6x2.2 smd: 1(-4.445,-2.6) 2(-3.175,-2.6) 3(-1.905,-2.6) 4(-0.635,-2.6) 5(0.635,-2.6) 6(1.905,-2.6) 7(3.175,-2.6) 8(4.445,-2.6) 9(4.445,2.6) 10(3.175,2.6) 11(1.905,2.6) 12(0.635,2.6) 13(-0.635,2.6) 14(-1.905,2.6) 15(-3.175,2.6) 16(-4.445,2.6)
  silkscreen extent -5.42,-2.72 5,1.1
SOP-8 [mil]
  rect 65x25 smd: 1(0,0) 2(0,-50) 3(0,-100) 4(0,-150) 5(224.41,-150) 6(224.41,-100) 7(224.41,-50) 8(224.41,0)
  silkscreen extent 65,-175 159,25
SOT23-6N [mm] "3x1.6x1.1mm(长宽高)"
  rect 1x0.55 smd: 1(1.3,-0.95) 2(1.3,0) 3(1.3,0.95) 4(-1.3,0.95) 5(-1.3,0) 6(-1.3,-0.95)
  silkscreen extent -0.51,-1.78 1.78,1.55, body extent -1.4,-1.5 1.4,1.5, height 1.15
SOT-23R [mm] "SOT-23; 3 Leads; Body 3.0 x 2.5 mm, inc. leads (LxW max)"
  rect 0.9x0.95 smd: 1(0.95,-1.048) 2(-0.95,-1.048) 3(0,1.302)
  silkscreen extent -2.07,-1.17 1.3,1.3
ST480MC [mm]
  round 0.23 smd: A1(0.4,-0.4) A2(0,-0.4) A3(-0.4,-0.4) B1(0.4,0) B3(-0.4,0) C1(0.4,0.4) C2(0,0.4) C3(-0.4,0.4)
  silkscreen extent -1.4,-0.9 0.95,1.52
TP-1.5 [mm] "1.5mm"
  round 1.5 smd far side: 1(0,0)
TSOP44 [mm]
  rect 1.8x0.4 smd: 1(-0.009,0.001) 2(-0.009,-0.799) 3(-0.009,-1.599) 4(-0.009,-2.399) 5(-0.009,-3.199) 6(-0.009,-3.999) 7(-0.009,-4.799) 8(-0.009,-5.599) 9(-0.009,-6.399) 10(-0.009,-7.199) 11(-0.009,-7.999) 12(-0.009,-8.799) 13(-0.009,-9.599) 14(-0.009,-10.399) 15(-0.009,-11.199) 16(-0.009,-11.999) 17(-0.009,-12.799) 18(-0.009,-13.599) 19(-0.009,-14.399) 20(-0.009,-15.199) 21(-0.009,-15.999) 22(-0.009,-16.799) 23(11.991,-16.799) 24(11.991,-15.999) 25(11.991,-15.199) 26(11.991,-14.399) 27(11.991,-13.599) 28(11.991,-12.799) 29(11.991,-11.999) 30(11.991,-11.199) 31(11.991,-10.399) 32(11.991,-9.599) 33(11.991,-8.799) 34(11.991,-7.999) 35(11.991,-7.199) 36(11.991,-6.399) 37(11.991,-5.599) 38(11.991,-4.799) 39(11.991,-3.999) 40(11.991,-3.199) 41(11.991,-2.399) 42(11.991,-1.599) 43(11.991,-0.799) 44(11.991,0.001)
  silkscreen extent 1.83,-17.2 10.16,0.4
"USB Type-C" [mm] "USB Type-C 12P/16P"
  rect 0.6x1.3 smd mask+0.064: 1(-3.2,2.462) 2(-2.4,2.462) 11(2.4,2.462) 12(3.2,2.462)
  rect 0.3x1.3 smd mask+0.064: 3(-1.75,2.462) 4(-1.25,2.462) 5(-0.75,2.462) 6(-0.25,2.463) 7(0.25,2.463) 8(0.75,2.462) 9(1.25,2.462) 10(1.75,2.462)
  oval 1.2x2.5 hole 0.6 slot 1.6 at 90 deg: SH1(-4.32,1.718) SH3(4.32,1.717)
  oval 1.4x2 hole 0.6 slot 1.2 at 90 deg: SH2(-4.32,-2.462) SH4(4.32,-2.462)
  rect 1x1 smd mask+0: SH2(-1.524,-1.016) SH2(-1.524,-2.54) SH2(-1.524,-4.064) SH2(0,-1.016) SH2(0,-2.54) SH2(0,-4.064) SH2(1.524,-4.064)
  rect 1x1 smd paste+0 mask+0: SH2(1.524,-1.016) SH2(1.524,-2.54)
  round 0.65 hole 0.65 unplated mask+0: ""(-2.89,1.218) ""(2.89,1.218)
  silkscreen extent -4.34,-5.07 4.32,0.25, body extent -4.47,-5.04 4.47,2.86, height 3.2
USB-A-90 [mm]
  round 1.3 hole 0.8: 1(-6.5,2.7) 2(-4.5,2.7) 3(-2.5,2.7) 4(-0.5,2.7)
  oval 2.6x1.8 hole 1 slot 1.6 at 0 deg: 5(0,-0.1) 6(0,5.5) 7(-7,5.5) 8(-7,-0.1)
  silkscreen extent -19.4,-0.9 0,6.3
XTAL32 [mil]
  oval 50x40 hole 28: 1(0,0) 2(0,-56)
  rect 92.13x86 smd: ""(220,-27)
  silkscreen extent -28,-77 264,25
XTAL_US [mil]
  round 50 hole 28: 1(0,0) 2(192.13,0)
  rect 50x50 smd: ""(-130.32,0) ""(322.44,0)
  silkscreen extent -131,-98 323,98
YT8512C [mm]
  rect 0.4x0.25 smd: 1(-0.55,-0.55) 2(-0.55,-1.05) 3(-0.55,-1.55) 4(-0.55,-2.05) 5(-0.55,-2.55) 6(-0.55,-3.05) 7(-0.55,-3.55) 8(-0.55,-4.05) 17(4.05,-4.05) 18(4.05,-3.55) 19(4.05,-3.05) 20(4.05,-2.55) 21(4.05,-2.05) 22(4.05,-1.55) 23(4.05,-1.05) 24(4.05,-0.55)
  rect 0.25x0.4 smd: 9(0,-4.6) 10(0.5,-4.6) 11(1,-4.6) 12(1.5,-4.6) 13(2,-4.6) 14(2.5,-4.6) 15(3,-4.6) 16(3.5,-4.6) 25(3.5,0) 26(3,0) 27(2.5,0) 28(2,0) 29(1.5,0) 30(1,0) 31(0.5,0) 32(0,0)
  rrect0% 3.4x3.4 smd: 33(1.75,-2.3)
  silkscreen extent -0.87,-4.94 4.37,0.37

## Part data
BAT: library part BAT
BOOT: "Header, 3-Pin, Dual row", LatestRevisionDate=17-Jul-2002, LatestRevisionNote="Re-released for DXP Platform.", Publisher="Altium Limited"
C1 C2 C3 C4 C5 C6 C7 C9 C12 C13 C14 C15 C16 C17 C18 C19 C20 C21 C22 C23 C24 C25 C26 C27 C28 C29 C30 C32 C33 C34 C35 C36 C37 C38 C39 C40 C41 C42 C43 C44 C45 C46 C47 C48 C49 C53 C54 C59 C60 C62 C63 C64 C65 C66 C67 C68 C69 C70 C71 C72 C73 C74 C75 C76 C77 C78 C79 C80 C81 C82 C83 C84 C85 C86 C87 C88 C89 C90 C91 C92 C93 C94 C95: library part C
C8: library part C-0603-SMD
C10 C11 C31 C57 C61: library part CAP
C50 C51 C55: library part C, "无极性贴片电容", BOM名称=无极性贴片电容, 学习资源=www.ooocke.com, 版权归属=源创客
C52: library part C-CM, "贴片电解电容", BOM名称=贴片电解电容, 学习资源=www.ooocke.com, 版权归属=源创客
C56 C58: library part C, "无极性贴片电容,25V", BOM名称=无极性贴片电容, 学习资源=www.ooocke.com, 版权归属=源创客
CAN RS485: library part HEAD2
COM2 COM3: library part DB9
D1 D4 D5: library part D
D2 D3: library part SMBJ, "TVS"
DC_IN1: library part P-DC, "低压电源接口", BOM名称=DC电源接口, 学习资源=www.ooocke.com, 版权归属=源创客
DS0 DS1 PWR: library part LED2, "Typical RED, GREEN, YELLOW, AMBER GaAs LED", PackageDocument=Feb-2002, LatestRevisionDate=17-Jul-2002, LatestRevisionNote="Re-released for DXP Platform.", PackageReference=3.2X1.6X1.1, Published=8-Jun-2000, Publisher="Altium Limited"
EARTHNET: library part HR911105
F1 R1 R2 R3 R4 R5 R6 R7 R8 R9 R10 R12 R13 R14 R15 R16 R17 R18 R19 R20 R21 R22 R23 R24 R25 R26 R27 R28 R29 R30 R31 R32 R33 R34 R35 R36 R37 R38 R39 R40 R45 R46 R47 R48 R49 R50 R51 R52 R53 R54 R55 R56 R57 R58 R59 R60 R61 R62 R63 R64 R65 R66 R67 R68 R69 R70 R71 R72 R73 R74 R75 R76 R77 R78: library part R
L1: library part L
L2: library part L-CDRH, "功率屏蔽电感", BOM名称=功率屏蔽电感, 学习资源=www.ooocke.com, 版权归属=源创客
LINE_IN PHONE: library part PHONE_M
LS1: "LIGHT SENS"
MIC1: library part MIC-6022
MOS1: library part MOS-P, "IRLML6401/SI2301"
P1: "Header, 2-Pin", LatestRevisionDate=17-Jul-2002, LatestRevisionNote="Re-released for DXP Platform.", Publisher="Altium Limited"
P2 P4 P5 VOUT1 VOUT2: library part "Header 3X2", "Header, 3-Pin, Dual row", LatestRevisionDate=17-Jul-2002, LatestRevisionNote="Re-released for DXP Platform.", Publisher="Altium Limited"
P3: library part "Header 9X2", "Header, 9-Pin, Dual row", LatestRevisionDate=17-Jul-2002, LatestRevisionNote="Re-released for DXP Platform.", Publisher="Altium Limited"
P6: library part "Header 2", "Header, 2-Pin", LatestRevisionDate=17-Jul-2002, LatestRevisionNote="Re-released for DXP Platform.", Publisher="Altium Limited"
P7: library part "Header 16", "Header, 16-Pin", LatestRevisionDate=17-Jul-2002, LatestRevisionNote="Re-released for DXP Platform.", Publisher="Altium Limited"
P10: library part "Header 2X2", "Header, 2-Pin, Dual row", LatestRevisionDate=17-Jul-2002, LatestRevisionNote="Re-released for DXP Platform.", Publisher="Altium Limited"
P11: "Header, 4-Pin", LatestRevisionDate=17-Jul-2002, LatestRevisionNote="Re-released for DXP Platform.", Publisher="Altium Limited"
Q1 Q2 Q4: library part NPN, "8050/BCW846/BCW847"
Q3: library part PNP, "8550/BCW68"
R11 R41 R42 R43 R44: library part R, "贴片电阻"
  R41 R42 R43 R44: BOM名称=贴片电阻, 学习资源=www.ooocke.com, 版权归属=源创客
RV1: library part RV
SP+ SP-: library part TEST-POINT, "测试点"
"TF CARD": "SD,MICRO,TF"
U1: "24bit ADC&DAC 96Khz"
U2: "10M/100M 网络PHY RMII/MII"
U3: "5V, 3W, 功放IC"
U4: library part MAX3232
U5: library part 24C256
U6: library part MAX3485
U7: library part SN65HVD230D
U8: library part W25X16, "W25X16;SST25VF016;MX25L1605"
U9: "三轴磁力计"
U10: library part "DC JW5060T_6", "DC降压芯片"
U11 U12: library part AMS1117
U13: "USB2UART"
U14: library part STM32F407ZET6, "STM32F407ZET6"
U15: library part IS62WV51216
U16: library part NRF24L01
U17: library part ATK-HC05, "ATK-HC05"
U18: library part HS0038
U19: library part DHT11, "数字温湿度传感器"
"USB SLAVE" "USB UART": library part "USB Type-C", "12P TypeC 母座"
USB_HOST: library part USB_A_90
VD1: library part SS14, "肖特基二极管", BOM名称=肖特基二极管, 学习资源=www.ooocke.com, 属性=40V/1A, 版权归属=源创客
Y1 Y2 Y3: library part XTAL, "Crystal Oscillator", LatestRevisionDate=17-Jul-2002, LatestRevisionNote="Re-released for DXP Platform.", Published=8-Jun-2000, Publisher="Altium Limited"

## Free pads (board coordinates)
  round 1 smd: 0(158.674,105.461) 1(2.591,7.163)
  round 3.2 hole 3.2: 4(5.08,3.531) 4(5.08,117.379) 4(157.836,3.531) 4(157.836,117.379)
  round 3 hole 3: 4(13.918,107.112) 4(17.093,12.878) 4(134.568,90.221) ""(146.506,23.673)

## Via types
v1: diameter 0.61, hole 0.305, Top Layer to Bottom Layer, tented both sides, 732 vias
v2: diameter 0.762, hole 0.457, Top Layer to Bottom Layer, tented both sides, 23 vias
v3: diameter 0.6, hole 0.3, Top Layer to Bottom Layer, 12 vias
v4: diameter 0.7, hole 0.4, Top Layer to Bottom Layer, tented both sides, 5 vias

## Nets (pads, with @x,y where several pads share a name; then routed paths per layer and width w, separated by ;. In a path a pad name is that pad's centre, name@x,y a point inside that pad or via, vN(x,y) a via of type N, cw(c..) or ccw(c..) an arc to the next point about the centre after c; other vN are vias at no path point)
1WIRE_DQ: P3.18 P9.14 R75.1 U14.124 U19.2 | length 138.1
  Top Layer w0.203: P3.18@31.149,5.328 31.149,10.397 35.052,14.3 v1(35.052,23.876) ; v1(34.036,28.626) 33.147,29.515 33.147,44.374 33.677,44.903 P9.14@34.965,44.903 35.223,45.161 35.966,45.161 36.982,46.177 48.773,46.177 55.149,39.802 69.774,39.802 70.409,40.437 70.409,42.977 69.729,43.657 U14.124@69.729,45.683 ; v1(40.97,5.537) 41.79,4.717 42.494,4.717 43.644,5.867 47.473,5.867 51.587,1.753 67.031,1.753 67.869,2.591 R75.1@69.037,2.591 69.037,1.981 69.317,1.702 74.6,1.702 U19.2@76.759,3.861
  Bottom Layer w0.203: P3.18@31.149,5.328 31.358,5.537 v1(40.97,5.537) ; v1(34.036,28.626) 34.036,26.619 35.052,25.603 v1(35.052,23.876)
3D_INT: P8.19 U14.26 U17.1 | length 90.9
  Top Layer w0.203: U14.26@82.229,60.683 84.075,60.683 85.038,61.646 98.755,61.646 98.755,61.6 99.898,60.457 99.898,58.903 102.237,56.564 105.31,56.564 108.128,53.746 110.196,53.746 P8.19@111.419,52.523 ; v1(122.276,52.629) 130.937,52.629 132.486,51.079 146.848,51.079 149.098,53.329 149.098,58.09 151.232,60.223 151.232,61.176 151.028,61.379 v1(151.028,62.738)
  Bottom Layer w0.203: P8.19@111.419,52.523 111.524,52.629 v1(122.276,52.629) ; v1(151.028,62.738) 151.028,62.832 153.515,65.318 U17.1@156.78,65.318
AGND: C3.1 C4.1 C5.1 C6.1 C14.2 C15.1 C16.1 C17.1 C18.1 C20.2 LINE_IN.3 PHONE.3 R1.1 R9.2 U1.13 U1.18 U1.29 | length 90.2
  Top Layer w0.203: U1.13@123.756,38.521 U1.29@124.841,38.521 ; U1.29@124.881,38.521 U1.29@125.781,39.421 U1.18@125.781,37.396
  Top Layer w0.508: v1(120.548,35.535) 120.548,31.902 122.352,30.099 C6.1@123.241,30.099 C4.1@124.892,30.099 ; v1(122.072,34.214) C5.1@123.114,34.214 ; R9.2@135.474,36.982 135.52,37.028 135.52,37.523 135.818,37.821 v1(137.719,37.821)
  Top Layer w0.635: v1(118.897,41.453) 118.899,41.451 C16.1@119.951,41.451 ; C5.1@123.114,34.214 C3.1@124.384,34.214 ; v1(125.748,32.875) 125.741,32.882 125.741,33.996 C17.1@125.781,34.036 126.809,34.036 C18.1@127.178,34.036 ; C20.2@136.576,39.786 136.611,39.751 137.693,39.751 v1(137.719,39.776)
  Top Layer w1.016: v1(137.668,31.115) 154.686,31.115 158.039,34.468 158.039,38.278 156.944,39.373 156.944,42.89 157.912,43.858 157.912,47.684 156.944,48.652 LINE_IN.3@156.944,48.771
  Bottom Layer w0.635: v1(118.897,41.453) 118.915,41.453 118.953,41.415 119.139,41.415 v1(122.276,38.278) ; v1(124.841,38.456) 122.453,38.456 v1(122.276,38.278) ; v1(125.748,32.875) 125.012,32.875 123.673,34.214 v1(122.072,34.214) 121.869,34.214 v1(120.548,35.535) 120.548,36.551 v1(122.276,38.278)
  Bottom Layer w1.016: v1(137.643,43.713) 137.719,43.637 v1(137.719,39.776) v1(137.719,37.821) 137.668,37.77 v1(137.668,31.115)
  other v1: 126.721,38.456 124.841,39.421 126.695,39.446 124.841,40.386 125.806,40.386 126.695,40.386 128.753,41.478 128.753,42.266
BEEP: P8.18 R64.1 U14.20 | length 103.8
  Top Layer w0.203: R64.1@44.475,15.646 44.475,25.984 46.584,28.092 55.058,28.092 59.07,32.105 74.267,32.105 76.188,34.026 76.188,34.608 v1(76.2,34.62) ; v1(78.232,57.328) 78.587,57.683 U14.20@82.229,57.683 83.744,57.683 84.176,57.252 88.524,57.252 89.718,56.058 98.44,56.058 104.514,49.983 P8.18@108.879,49.983
  Bottom Layer w0.203: v1(76.2,34.62) 76.2,36.047 75.844,36.402 75.844,47.634 77.572,49.361 77.572,56.717 78.183,57.328 v1(78.232,57.328)
BOOT0: R50.1 R73.2 U14.138 | length 57.6
  Top Layer w0.203: U14.138@76.729,45.683 76.729,43.586 76.327,43.184 R50.1@76.327,42.596 76.356,42.567 76.813,42.567 76.932,42.448 76.932,40.686 v1(76.908,40.662) ; v1(77.685,36.335) 79.82,36.335 84.844,41.359 96.997,41.359 103.965,34.391 103.965,33.48 107.061,30.384 107.061,28.499 106.401,27.838 104.927,27.838 104.419,27.33 104.419,22.86 104.75,22.53 R73.2@105.477,22.53
  Bottom Layer w0.203: v1(76.908,40.662) 76.908,37.138 77.685,36.361 v1(77.685,36.335)
BOOT1: P8.33 R74.1 TFTLCD.29 U14.48 | length 144.7
  Top Layer w0.203: U14.48@74.229,68.183 74.229,72.806 76.53,75.108 86.462,75.108 87.528,74.041 v1(88.722,74.041) 103.657,74.041 106.147,71.552 110.171,71.552 P8.33@111.419,70.303 115.193,70.303 116.205,69.291 116.205,26.67 116.561,26.314 v1(116.561,25.222) ; R74.1@105.461,24.054 105.588,24.181 105.588,24.697 105.707,24.816 111.252,24.816 v1(111.303,24.765)
  Bottom Layer w0.203: TFTLCD.29@88.314,111.944 88.925,111.332 88.925,109.131 88.78,109.131 88.43,108.781 88.43,108.287 88.456,108.262 88.456,104.076 88.722,103.81 v1(88.722,74.041) ; v1(111.303,24.765) 114.452,24.765 114.986,25.298 116.484,25.298 v1(116.561,25.222)
CAN_RX: P5.1 U7.4 | length 61.1
  Top Layer w0.203: v1(43.739,79.781) 50.368,79.781 56.312,85.725 56.312,92.634 53.365,95.58 50.19,95.58 48.565,97.206 U7.4@46.66,97.206
  Bottom Layer w0.203: P5.1@19.99,73.584 19.99,75.768 21.793,77.572 32.08,77.572 33.655,79.146 39.675,79.146 40.31,79.781 v1(43.739,79.781)
CAN_TX: P5.2 U7.1 | length 63.5
  Top Layer w0.203: v1(44.45,78.867) 50.47,78.867 56.693,85.09 56.693,92.888 53.619,95.961 50.348,95.961 49.149,97.16 49.149,100.228 48.362,101.016 U7.1@46.66,101.016
  Bottom Layer w0.203: P5.2@22.53,73.584 22.53,76.2 23.089,76.759 38.887,76.759 40.97,78.842 44.425,78.842 v1(44.45,78.867)
CH340_D+: "USB UART.6" "USB UART.8" U13.5 | length 34.2
  Top Layer w0.203: 8.965,13.347 8.065,13.347 7.823,13.589 7.823,14.199 7.972,14.347 8.965,14.347 ; 8.965,13.386 12.718,13.386 15.766,16.434 18.257,16.434 19.603,15.088 25.05,15.088 26.443,16.48 26.443,20.428 25.687,21.184 22.499,21.184 21.92,20.605 21.92,19.828 21.801,19.709 21.585,19.709 21.387,19.511 U13.5@21.387,18.711
CH340_D-: "USB UART.5" "USB UART.7" U13.6 | length 31.8
  Top Layer w0.203: 8.965,13.847 9.961,13.847 ; 8.965,14.847 10.02,14.847 10.185,14.681 10.185,14.072 ; 10.439,13.847 10.41,13.847 ; U13.6@22.657,18.711 22.657,19.511 22.458,19.709 22.42,19.709 22.301,19.828 22.301,20.447 22.657,20.803 25.53,20.803 26.062,20.27 26.062,16.638 24.892,15.469 19.761,15.469 18.415,16.815 15.608,16.815 12.641,13.847 10.41,13.847 ; 9.961,13.847 10.16,13.847 ; 9.961,13.847 10.185,14.072 ; 10.16,13.847 10.41,13.847 ; 10.16,13.847 10.185,13.872 10.185,14.072 ; 10.185,14.072 10.41,13.847
DCMI__SCL: P3.4 P9.16 R19.1 U14.122 | length 100.8
  Top Layer w0.203: P3.4@13.369,5.328 16.753,8.712 21.615,8.712 28.219,15.316 28.219,30.761 27.762,31.218 27.762,32.893 28.067,33.198 28.067,47.371 v1(28.143,47.447) ; P9.16@34.965,47.443 36.188,48.666 47.467,48.666 55.57,40.564 67.674,40.564 67.793,40.683 67.793,42.393 67.916,42.516 68.374,42.516 68.729,42.872 U14.122@68.729,45.683
  Bottom Layer w0.203: v1(28.143,47.447) 34.677,47.447 34.823,47.301 P9.16@34.965,47.443
DCMI__SDA: P3.6 P9.15 R20.1 U14.123 | length 98.1
  Top Layer w0.203: P3.6@15.909,5.328 18.404,7.823 21.804,7.823 28.981,15.001 28.981,33.071 28.702,33.35 v1(28.702,46.177) ; v1(33.401,46.228) 36.214,46.228 37.43,47.443 P9.15@37.505,47.443 37.61,47.549 48.046,47.549 55.412,40.183 68.682,40.183 69.088,40.589 69.088,42.035 69.4,42.347 69.499,42.347 R20.1@69.698,42.545 69.229,43.014 U14.123@69.229,45.683
  Bottom Layer w0.203: v1(28.702,46.177) 28.753,46.228 v1(33.401,46.228)
DCMI__XCLK: P3.17 P9.27 R70.1 U14.100 | length 163.8
  Top Layer w0.203: P3.17@31.149,2.788 36.017,7.656 36.017,24.511 37.998,26.492 44.303,26.492 46.284,28.473 54.9,28.473 58.939,32.512 73.762,32.512 74.295,33.045 v1(74.346,33.045) ; P9.27@37.505,62.683 38.906,64.084 41.529,64.084 53.43,52.183 U14.100@59.729,52.183 62.295,52.183 64.465,50.013 64.489,50.013 v1(64.516,49.986) ; v1(41.961,5.461) 41.964,5.461 42.803,6.299 47.65,6.299 51.689,2.261 58.903,2.261 59.563,2.921 59.563,6.071 60.147,6.655 R70.1@61.646,6.655
  Bottom Layer w0.203: P3.17@31.149,2.788 33.496,2.788 35.56,4.851 41.351,4.851 v1(41.961,5.461) ; v1(64.516,49.986) 64.516,48.26 65.989,46.787 70.764,46.787 72.238,48.26 73.482,48.26 74.346,47.396 v1(74.346,33.045)
DCMI_D0: P3.8 P9.31 U1.1 U14.96 | length 216.5
  Top Layer w0.203: P3.8@18.449,5.328 18.449,5.571 20.32,7.442 22.013,7.442 29.362,14.792 29.362,55.169 26.213,58.318 v1@26.213,62.839 ; v1(32.69,65.888) 33.325,66.523 35.966,66.523 37.207,67.763 P9.31@37.505,67.763 40.212,67.763 53.792,54.183 U14.96@59.729,54.183 63.089,54.183 v1(63.094,54.178) ; v1(77.673,34.747) 77.687,34.734 78.757,34.734 85.002,40.978 96.839,40.978 103.584,34.233 103.584,33.322 106.172,30.734 v1(106.172,30.175) ; U1.1@127.131,41.446 127.127,41.45 127.127,42.07 127.356,42.299 v1(127.356,42.393)
  Bottom Layer w0.203: v1(26.213,63.017) 26.213,64.728 27.28,65.794 32.597,65.794 v1(32.69,65.888) ; v1(63.094,54.178) 63.094,48.895 65.684,46.304 70.866,46.304 72.441,47.879 73.324,47.879 73.736,47.467 73.736,32.793 74.195,32.334 75.26,32.334 v1(77.673,34.747) ; v1(106.172,30.175) 106.172,31.75 105.893,32.029 105.893,38.684 108.331,41.123 112.217,41.123 113.157,42.062 127.025,42.062 v1(127.356,42.393)
DCMI_D1: P3.9 P9.30 U14.97 | length 105
  Top Layer w0.203: P3.9@20.989,2.788 22.327,4.126 22.327,5.893 30.988,14.554 30.988,55.276 28.194,58.07 v1(28.194,65.049) ; P9.30@34.965,65.223 35.328,65.223 36.576,66.472 40.818,66.472 53.606,53.683 U14.97@59.729,53.683
  Bottom Layer w0.203: v1(28.194,65.049) 34.791,65.049 P9.30@34.965,65.223
DCMI_D2: "TF CARD.7" P3.10 P9.29 R29.2 U14.98 | length 139.9
  Top Layer w0.203: 16.688,93.858 18.283,93.858 18.481,94.056 R29.2@19.523,94.056 19.498,94.031 19.498,93.439 19.617,93.32 22.956,93.32 23.444,92.832 23.444,84.201 27.534,80.112 27.534,64.008 v1(27.584,63.957) ; P3.10@20.989,5.328 21.177,5.328 30.607,14.757 30.607,55.118 27.584,58.141 v1@27.584,63.787 ; v1(33.223,64.008) 35.433,64.008 36.457,65.032 37.313,65.032 P9.29@37.505,65.223 41.527,65.223 53.568,53.183 U14.98@59.729,53.183
  Bottom Layer w0.203: v1(27.584,63.957) 27.559,63.957 27.508,64.008 v1(33.223,64.008)
DCMI_D3: "TF CARD.8" P3.11 P9.28 R31.2 U14.99 | length 142.7
  Top Layer w0.203: 16.688,94.958 18.491,94.958 18.859,95.326 R31.2@19.472,95.326 ; R31.2@19.523,95.275 19.523,94.79 19.642,94.671 22.144,94.671 23.876,92.939 23.876,84.557 27.965,80.467 27.965,67.92 28.82,67.065 28.82,62.721 v1(28.829,62.713) 28.829,58.064 32.194,54.699 32.194,53.353 31.75,52.908 31.75,14.168 24.74,7.157 24.74,3.999 P3.11@23.529,2.788 ; v1(32.537,63.221) 33.02,62.738 34.91,62.738 P9.28@34.965,62.683 36.29,64.008 38.075,64.008 38.532,64.465 41.732,64.465 53.514,52.683 U14.99@59.729,52.683
  Bottom Layer w0.203: v1(28.829,62.713) 28.854,62.687 29.388,63.221 v1(32.537,63.221)
DCMI_D4: "TF CARD.2" P3.12 P9.22 R22.2 U14.112 | length 139.6
  Top Layer w0.203: 16.688,88.358 19.392,88.358 R22.2@19.498,88.464 19.54,88.422 19.54,87.978 19.736,87.782 21.742,87.782 22.301,88.341 v1(22.86,88.341) ; P3.12@23.529,5.328 23.777,5.576 23.777,6.734 31.369,14.326 31.369,53.848 v1(31.61,54.089) ; v1(25.832,88.417) 25.832,87.02 30.353,82.499 30.353,70.434 31.42,69.367 31.42,58.725 34.965,55.18 P9.22@34.965,55.063 35.023,55.121 36.061,56.159 43.282,56.159 56.236,43.205 62.586,43.205 63.729,44.349 U14.112@63.729,45.683
  Bottom Layer w0.203: v1(22.86,88.341) 25.747,88.341 25.832,88.257 v1(25.832,88.417) ; v1(31.61,54.089) 32.584,55.063 P9.22@34.965,55.063
DCMI_D5: P3.13 P9.4 U14.136 | length 83.9
  Top Layer w0.203: P3.13@26.069,2.788 27.28,3.999 27.28,8.407 33.401,14.529 v1(33.401,24.536) ; P9.4@34.965,32.203 36.163,33.401 46.308,33.401 47.806,31.902 53.347,31.902 57.386,35.941 71.53,35.941 75.253,39.664 75.253,43.187 75.729,43.663 U14.136@75.729,45.683
  Bottom Layer w0.203: v1(33.401,24.536) 33.401,30.639 P9.4@34.965,32.203
DCMI_D6: P3.14 P8.5 U14.4 | length 122.7
  Top Layer w0.203: P3.14@26.069,5.328 26.069,7.832 32.766,14.529 32.766,24.74 36.195,28.169 43.155,28.169 44.983,29.997 54.158,29.997 58.197,34.036 72.401,34.036 77.049,38.684 v1(78.689,38.684) ; v1(80.575,45.579) 80.543,45.61 80.543,49.539 80.662,49.658 82.203,49.658 U14.4@82.229,49.683 83.551,49.683 88.827,44.407 98.849,44.407 107.065,36.191 109.971,36.191 P8.5@111.419,34.743
  Bottom Layer w0.203: v1(78.689,38.684) 78.689,43.693 v1(80.575,45.579)
DCMI_D7: P3.15 P8.8 U14.5 | length 120.7
  Top Layer w0.203: P3.15@28.609,2.788 29.769,3.948 29.769,9.601 34.468,14.3 34.468,24.536 37.196,27.264 43.927,27.264 45.898,29.235 54.541,29.235 58.58,33.274 73.005,33.274 74.402,34.671 75.133,34.671 77.927,37.465 v1(77.927,37.503) ; v1(79.35,47.396) 79.35,49.632 79.901,50.183 U14.5@82.229,50.183 82.254,50.158 83.615,50.158 88.984,44.788 99.28,44.788 106.763,37.306 108.856,37.306 P8.8@108.879,37.283
  Bottom Layer w0.203: v1@77.927,37.66 77.927,45.974 v1(79.35,47.396)